# Altium PCB PCB1.pcbdoc
Units mil, origin at the board's own origin, x right, y up, seen from the top; angles counter-clockwise.
Board outline 4500 x 2500 mil, 2 copper layers (Top Layer, Bottom Layer), stack 62.2 mil thick; 64 components, 41 nets, 178 pads, 0 vias.
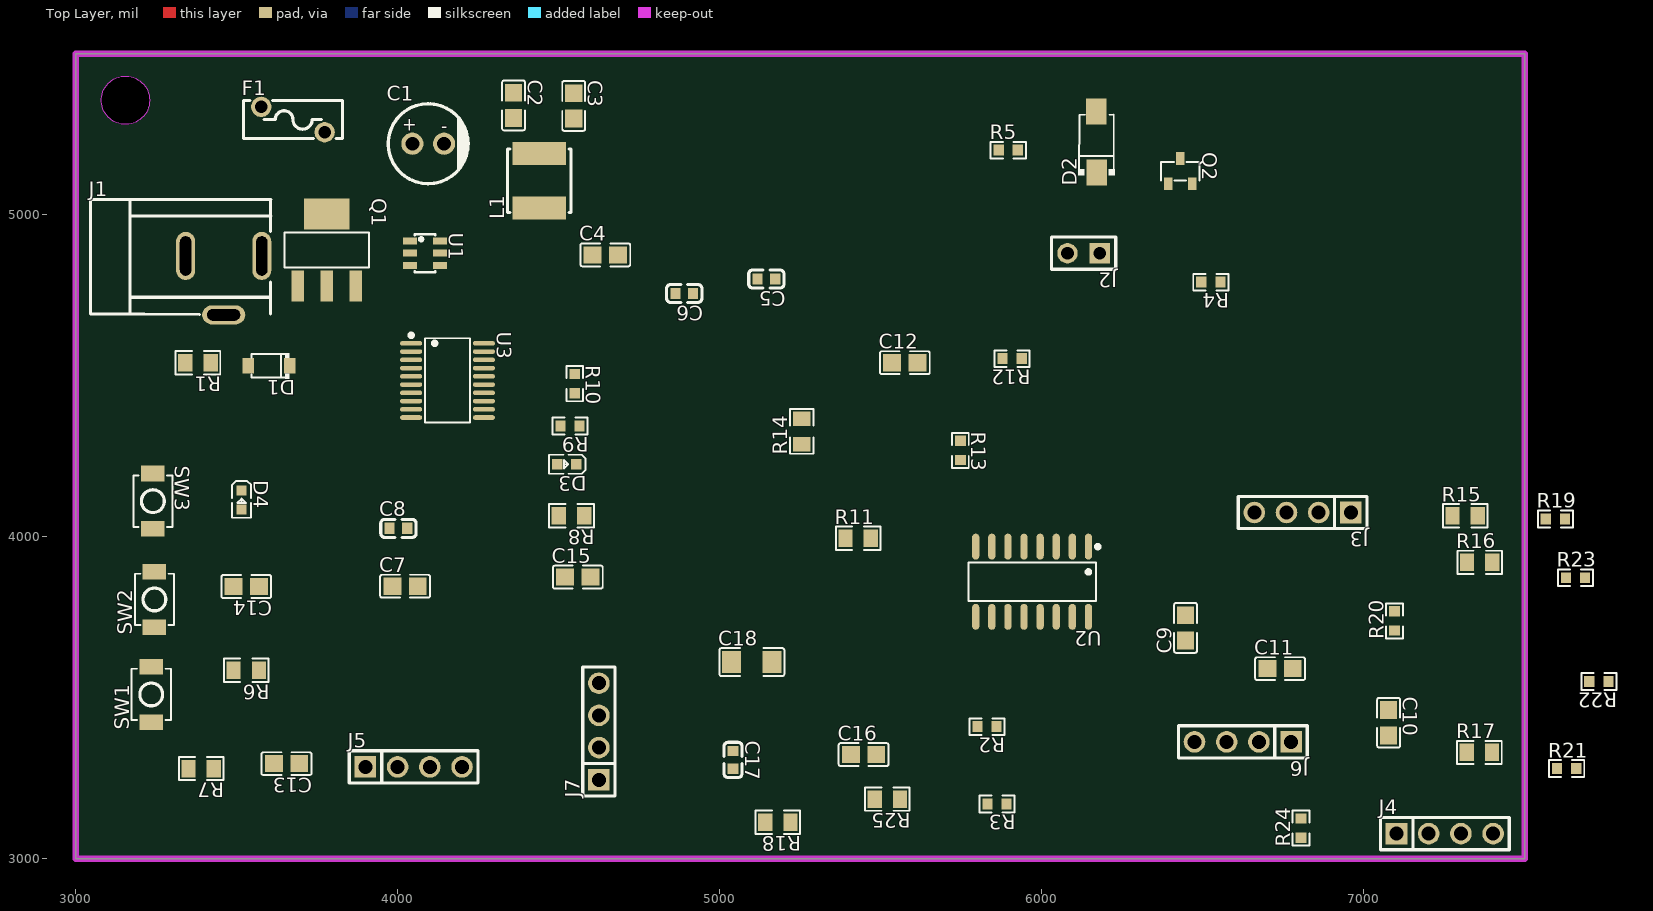
[diagram p0: Top Layer view]
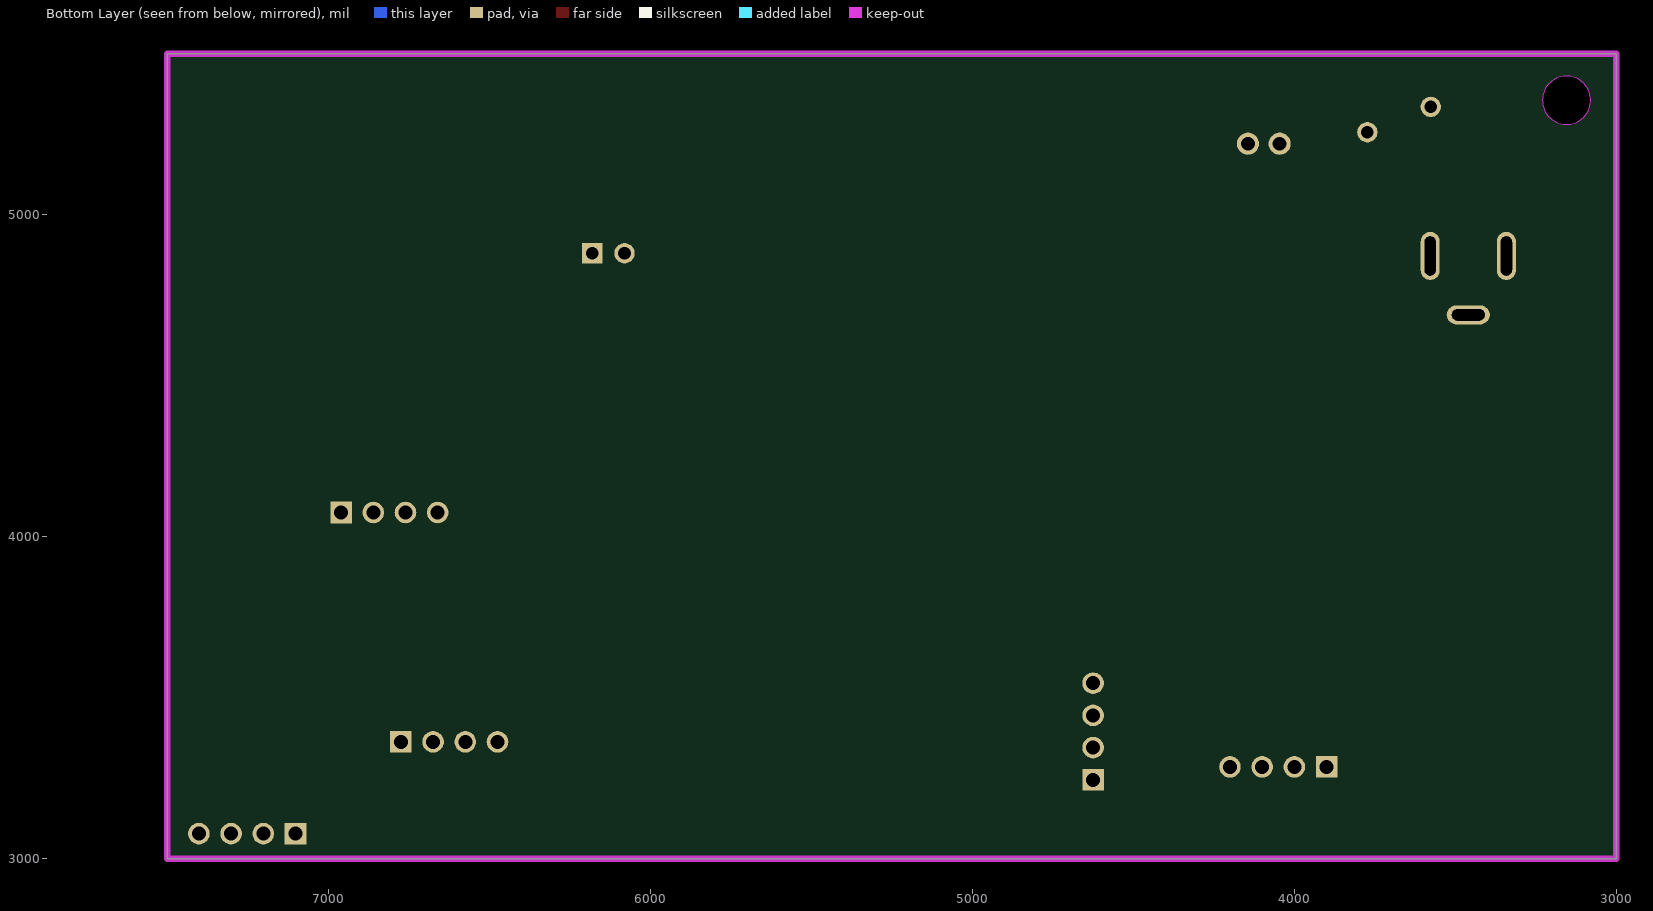
[diagram p1: Bottom Layer view, seen from below]

## Layer stack, top to bottom
Top Solder Mask Layer: solder mask 0.4, Dk 3.3
Top Layer: signal copper 1.4
Dielectric1: surface 59.4, FR4, Dk 4.5
Bottom Layer: signal copper 1.4
Bottom Solder Mask Layer: solder mask 0.4, Dk 3.3

## Board outline
3000,5500 3000,3000 7500,3000 7500,5500
cut-out: 3230,5355 3229.6,5347.3 3228.4,5339.7 3226.4,5332.2 3223.7,5325 3220.3,5318.1 3216.1,5311.5 3211.3,5305.5 3205.9,5300 3200,5295 3193.6,5290.7 3186.8,5287.1 3179.6,5284.2 3172.2,5282 3164.6,5280.6 3156.9,5280 3149.2,5280.2 3141.6,5281.2 3134,5283 3126.7,5285.5 3119.8,5288.8 3113.1,5292.8 3107,5297.4 3101.3,5302.7 3096.2,5308.5 3091.7,5314.7 3087.9,5321.5 3084.8,5328.5 3082.5,5335.9 3080.9,5343.5 3080.1,5351.1 3080.1,5358.9 3080.9,5366.5 3082.5,5374.1 3084.8,5381.5 3087.9,5388.5 3091.7,5395.3 3096.2,5401.5 3101.3,5407.3 3107,5412.6 3113.1,5417.2 3119.8,5421.2 3126.7,5424.5 3134,5427 3141.6,5428.8 3149.2,5429.8 3156.9,5430 3164.6,5429.4 3172.2,5428 3179.6,5425.8 3186.8,5422.9 3193.6,5419.3 3200,5415 3205.9,5410 3211.3,5404.5 3216.1,5398.5 3220.3,5391.9 3223.7,5385 3226.4,5377.8 3228.4,5370.3 3229.6,5362.7

## Design rules (kind name [scope] priority, off if disabled: settings)
BoardOutlineClearance copperThickness1oz [All] p0: genericclearance=10 ignorepadtopadclearanceinfootprint=FALSE except(0: Arc-SplitContinuation Track-SplitContinuation SMDPad-SplitContinuation THPad-SplitContinuation Via-SplitContinuation Fill-SplitContinuation Poly-SplitContinuation Region-SplitContinuation Text-SplitContinuation)
BoardOutlineClearance copperThickness2oz [All] p0: genericclearance=10 ignorepadtopadclearanceinfootprint=FALSE except(0: Arc-SplitContinuation Track-SplitContinuation SMDPad-SplitContinuation THPad-SplitContinuation Via-SplitContinuation Fill-SplitContinuation Poly-SplitContinuation Region-SplitContinuation Text-SplitContinuation)
BoardOutlineClearance Plane_innerPlane [All] p0: genericclearance=10 ignorepadtopadclearanceinfootprint=FALSE except(0: Arc-SplitContinuation Track-SplitContinuation SMDPad-SplitContinuation THPad-SplitContinuation Via-SplitContinuation Fill-SplitContinuation Poly-SplitContinuation Region-SplitContinuation Text-SplitContinuation)
BoardOutlineClearance Copper_copperRegion [All] p0: genericclearance=10 ignorepadtopadclearanceinfootprint=FALSE except(0: Arc-SplitContinuation Track-SplitContinuation SMDPad-SplitContinuation THPad-SplitContinuation Via-SplitContinuation Fill-SplitContinuation Poly-SplitContinuation Region-SplitContinuation Text-SplitContinuation)
BoardOutlineClearance otherClearance [All] p0: genericclearance=10 ignorepadtopadclearanceinfootprint=FALSE except(0: Arc-SplitContinuation Track-SplitContinuation SMDPad-SplitContinuation THPad-SplitContinuation Via-SplitContinuation Fill-SplitContinuation Poly-SplitContinuation Region-SplitContinuation Text-SplitContinuation)
Clearance copperThickness1oz [All] p1: gap=7 ignorepadtopadclearanceinfootprint=FALSE
Clearance copperThickness2oz [All] p1: gap=7 ignorepadtopadclearanceinfootprint=FALSE
Clearance Plane_innerPlane [All] p1: gap=7 ignorepadtopadclearanceinfootprint=FALSE
Clearance Copper_copperRegion [All] p1: gap=7 ignorepadtopadclearanceinfootprint=FALSE
Clearance otherClearance [All] p1: gap=7 ignorepadtopadclearanceinfootprint=FALSE
DiffPairsRouting differentialPair [All] p1: maxuncoupledlength=10 minlimit=5.9843 maxlimit=Infinity mostfreqgap=5.9843 toplayer_minwidth=5 toplayer_prefwidth=10 toplayer_maxwidth=100 bottomlayer_minwidth=5 bottomlayer_prefwidth=10 bottomlayer_maxwidth=100
PasteMaskExpansion pasteMaskExpansion [All] p1: expansion=0
PlaneConnect innerPlane [All] p1: planeconnectstyle=Relief reliefexpansion=20 reliefentries=4 reliefconductorwidth=10 reliefairgap=10
PolygonConnect copperRegion [All] p1: connectstyle=Relief reliefentries=4 reliefconductorwidth=10 polygonreliefangle="90 Angle" airgapwidth=10
RoutingVias viaSize [All] p1: viastyle="Through Hole" holewidth=12.0078 minholewidth=11.811 maxholewidth=248.0314 width=12.0078 minwidth=11.811 maxwidth=248.0314
SolderMaskExpansion solderMaskExpansion [IsVia] p1: useseparateexpansions=TRUE expansion=-1000 expansionbottom=-1000
SolderMaskExpansion solderMaskExpansion [All] p2: useseparateexpansions=TRUE expansion=2.0079 expansionbottom=2.0079
Width copperThickness1oz [All] p1: maxlimit=100 minlimit=5 preferedwidth=10
Width copperThickness2oz [All] p1: maxlimit=100 minlimit=8 preferedwidth=10

## Components (designator, comment, footprint, x,y, rotation, side; value= is the part's Value field where it differs from the comment)
C1 "47uF" CAP-TH_BD6.3-P2.50-D0.6-FD 4095,5220 r0 top
C2 "10uF" C0805#1 4360.2,5338.9 r270 top
C3 "100nF" C0805#1 4546.9,5337.5 r270 top
C4 "100nF" C0805#2 4645,4875 r0 top
C5 "22uF" C0603#1 5145,4800 r180 top
C6 "22uF" C0603#1 4890,4755 r180 top
C7 "100nF" C0805#2 4023.1,3846 r0 top
C8 "4.7uF" C0603#2 4002.5,4025.6 r0 top
C9 "100nF" C0805#2 6446.6,3716.6 r90 top
C10 "100nF" C0805#3 7077.1,3422.3 r270 top
C11 "100nF" C0805#2 6740,3590 r0 top
C12 "100nF" C0805#2 5575,4540 r0 top
C13 "100nF" C0805#2 3655,3295 r180 top
C14 "100nF" C0805#2 3530,3845 r180 top
C15 "100nF" C0805#3 4559.6,3874.5 r0 top
C16 "100nF" C0805#2 5446.9,3323.1 r0 top
C17 "10uF" C0603#2 5041.5,3306.8 r270 top
C18 "220uF" C1206 5099.9,3610.6 r0 top
D1 "BZT52C10" SOD-123_L2.7-W1.6-LS3.7-RD 3600,4530 r180 top
D2 "SS16" SMA_L4.3-W2.6-LS5.0-RD 6170,5225 r90 top
D3 "FC-1608G1-520" LED0603-RD 4525,4225 r180 top
D4 "XL-1608SURC-06" LED0603-RD_RED 3515.3,4113.6 r270 top
F1 "RL60-050" FUSE-TH_L7.8-W3.0-P5.10-D0.5-S2.00 3675,5295 r0 top
J1 "DC005-T25" DC-IN-TH_DC-005-20A-1 3460,4780 r0 top
J2 "LAIL-PZ2.54-2P-L" CONN-TH_LAIL-PZ2.54-2P-L 6130,4880 r180 top
J3 "HX PZ2.54-1x4P ZZ" HDR-TH_4P-P2.54-V-M 6810,4075 r180 top
J4 "HX PZ2.54-1x4P ZZ" HDR-TH_4P-P2.54-V-M 7251.6,3077.8 r0 top
J5 "HX PZ2.54-1x4P ZZ" HDR-TH_4P-P2.54-V-M 4050,3285 r0 top
J6 "HX PZ2.54-1x4P ZZ" HDR-TH_4P-P2.54-V-M 6624.4,3362.8 r180 top
J7 "HX PZ2.54-1x4P ZZ" HDR-TH_4P-P2.54-V-M 4625,3395 r90 top
L1 "3.9uH" IND-SMD_L5.0-W5.0_FNR50XXS 4440,5105 r90 top
Q1 "DMP6023LE-13" SOT-223-4_L6.5-W3.5-P2.30-LS7.0-BR 3780,4890 r270 top
Q2 "AO3400A" SOT-23-3_L2.9-W1.3-P1.90-LS2.4-BR 6430,5135 r270 top
R1 "47kΩ" R0805 3380,4540 r180 top
R2 "1kΩ" R0603#1 5830,3410 r180 top
R3 "1kΩ" R0603#2 5861,3169.9 r180 top
R4 "1kΩ" R0603#1 6525,4790 r180 top
R5 "100kΩ" R0603#2 5896,5200 r0 top
R6 "10kΩ" R0805 3530,3585 r180 top
R7 "10kΩ" R0805 3390,3280 r180 top
R8 "10kΩ" R0805 4540,4065 r180 top
R9 "1kΩ" R0603#2 4535.2,4343.3 r180 top
R10 "1kΩ" R0603#1 4550,4475 r270 top
R11 "10kΩ" R0805 5430,3995 r0 top
R12 "100kΩ" R0603#2 5907.9,4552.5 r180 top
R13 "100kΩ" R0603#1 5747.4,4267.9 r270 top
R14 "10kΩ" R0805 5254.6,4326.7 r90 top
R15 "10kΩ" R0805 7315,4065 r0 top
R16 "10kΩ" R0805 7360,3920 r0 top
R17 "10kΩ" R0805 7358.9,3330 r0 top
R18 "10kΩ" R0805 5180.6,3113.1 r180 top
R19 "1kΩ" R0603#1 7595,4055 r0 top
R20 "1kΩ" R0603#3 7095.6,3738.5 r90 top
R21 "1kΩ" R0603#1 7630,3280 r0 top
R22 "1kΩ" R0603#1 7730,3550 r180 top
R23 "1kΩ" R0603#3 7657.2,3872.4 r0 top
R24 "1kΩ" R0603#1 6805,3095 r90 top
R25 "10kΩ" R0805 5520.6,3185 r180 top
SW1 "TS-1088-AR02016" SW-SMD_L3.9-W3.0-P4.45 3235,3510 r90 top
SW2 "TS-1088-AR02016" SW-SMD_L3.9-W3.0-P4.45 3245,3805 r90 top
SW3 "TS-1088-AR02016" SW-SMD_L3.9-W3.0-P4.45 3240,4110 r270 top
U1 "AP63203WU-7" TSOT-26_L2.9-W1.6-P0.95-LS2.8-BL 4085,4880 r270 top
U2 "74HC4052D,652" SO-16_L9.9-W3.9-P1.27-LS6.0-BL 5970,3860 r180 top
U3 "STM32G030F6P6" TSSOP-20_L6.5-W4.4-P0.65-LS6.4-BL 4155,4485 r270 top

## Footprints (in the part's own frame and the unit in brackets; to place one, negate y for a bottom-side part, rotate by r counter-clockwise, add the part's x,y. Pads: shape width x height; smd on the part's side, far side on the other; paste and mask are expansions set on the pad)
C0603#1 [mil]
  rect 31.5x35.4 smd: 1(-27.6,0) 2(27.6,0)
  silkscreen extent -55,-28 55,28
C0603#2 [mil]
  rect 31.5x35.4 smd: 1(-27.5,0) 2(27.6,0)
  silkscreen extent -55,-28 55,28
C0805#1 [mil]
  rect 55.5x53.1 smd paste-3937 mask+2: 1(-39.4,0) 2(39.3,0)
  silkscreen extent -77,-36 77,36
C0805#2 [mil]
  rect 55.5x53.1 smd paste-3937 mask+2: 1(-39.4,0) 2(39.4,0)
  silkscreen extent -77,-36 77,36
C0805#3 [mil]
  rect 55.5x53.1 smd paste-3937 mask+2: 1(-39.3,0) 2(39.4,0)
  silkscreen extent -77,-36 77,36
C1206 [mil]
  rect 58.5x68 smd paste-3937 mask+2: 1(-62.7,0) 2(62.7,0)
  silkscreen extent -101,-43 101,43
CAP-TH_BD6.3-P2.50-D0.6-FD [mil]
  round 68.9 hole 43.3 paste+0 mask+2: 1(-49.2,0) 2(49.2,0)
  silkscreen extent -124,-124 126,124
CONN-TH_LAIL-PZ2.54-2P-L [mil]
  rect 63x63 hole 39.4 paste+0 mask+2: 1(-50,0)
  round 63 hole 39.4 paste+0 mask+2: 2(50,0)
  silkscreen extent -100,-50 100,50
DC-IN-TH_DC-005-20A-1 [mil]
  oval 59.1x149.6 hole 35.4 slot 122.1 at 90 deg: 1(118.2,91.5) 2(-118.1,91.5)
  oval 133.9x59.1 hole 35.4 slot 102.4 at 0 deg: 3(0,-91.5)
  silkscreen extent -414,-90 146,267
FUSE-TH_L7.8-W3.0-P5.10-D0.5-S2.00 [mil]
  round 63 hole 39.4: 1(-98.4,39.4) 2(98.4,-39.4)
  silkscreen extent -154,-59 154,59
HDR-TH_4P-P2.54-V-M [mil]
  rect 66.9x66.9 hole 43.3: 1(-150,0)
  round 66.9 hole 43.3: 2(-50,0) 3(50,0) 4(150,0)
  silkscreen extent -200,-50 200,50
IND-SMD_L5.0-W5.0_FNR50XXS [mil]
  rect 70.9x165.4 smd: 1(-84.6,0) 2(84.6,0)
  silkscreen extent -98,-98 98,98
LED0603-RD [mil]
  rect 31.5x31.5 smd: 1(-29.5,0) 2(29.5,0)
  silkscreen extent -59,-29 55,30
LED0603-RD_RED [mil]
  rect 31.5x31.5 smd: 1(-29.5,-0.1) 2(29.5,0.2)
  silkscreen extent -59,-29 55,30
R0603#1 [mil]
  rect 31.8x34 smd paste-3937 mask+2: 1(-29.7,0) 2(29.7,0)
  silkscreen extent -54,-26 54,26
R0603#2 [mil]
  rect 31.8x34 smd paste-3937 mask+2: 1(-29.7,0) 2(29.6,0)
  silkscreen extent -55,-26 54,26
R0603#3 [mil]
  rect 31.8x34 smd paste-3937 mask+2: 1(-29.6,0) 2(29.7,0)
  silkscreen extent -54,-26 54,26
R0805 [mil]
  rect 44.6x54.2 smd paste-3937 mask+2: 1(-39.4,0) 2(39.4,0)
  silkscreen extent -69,-36 69,36
SMA_L4.3-W2.6-LS5.0-RD [mil]
  rect 80.6x63.8 smd: 1(-94.6,-0.4) 2(94.6,0.4)
  silkscreen extent -103,-57 85,57
SO-16_L9.9-W3.9-P1.27-LS6.0-BL [mil]
  oval 22.6x80.2 smd: 1(-175,-109) 2(-125,-109) 3(-75,-109) 4(-25,-109) 5(25,-109) 6(75,-109) 7(125,-109) 8(175,-109) 9(175,109) 10(125,109) 11(75,109) 12(25,109) 13(-25,109) 14(-75,109) 15(-125,109) 16(-175,109)
  silkscreen extent -210,-115 198,60
SOD-123_L2.7-W1.6-LS3.7-RD [mil]
  rect 35.8x48 smd: 1(-64.4,0) 2(64.4,0)
  silkscreen extent -63,-40 54,39
SOT-23-3_L2.9-W1.3-P1.90-LS2.4-BR [mil]
  rect 39.4x25.6 smd: 1(39.4,-37.4) 2(39.4,37.4) 3(-39.4,0)
  silkscreen extent -29,-60 29,60
SOT-223-4_L6.5-W3.5-P2.30-LS7.0-BR [mil]
  rect 97.2x38.6 smd: 1(111.6,-90.6) 2(111.6,0) 3(111.6,90.6)
  rect 97.2x141.7 smd: 4(-111.6,0)
  silkscreen extent -54,-131 54,131
SW-SMD_L3.9-W3.0-P4.45 [mil]
  rect 48.4x73.2 smd: 1(-86,0) 2(86,0)
  silkscreen extent -80,-61 80,61
TSOT-26_L2.9-W1.6-P0.95-LS2.8-BL [mil]
  rect 21.7x43.3 smd paste+0 mask+2: 1(-37.4,-47.2) 2(0,-47.2) 3(37.4,-47.2) 4(37.4,47.2) 5(0,47.2) 6(-37.4,47.2)
  silkscreen extent -59,-32 59,32
TSSOP-20_L6.5-W4.4-P0.65-LS6.4-BL [mil]
  oval 14.3x68.6 smd: 1(-115.2,-113) 2(-89.6,-113) 3(-64,-113) 4(-38.4,-113) 5(-12.8,-113) 6(12.8,-113) 7(38.4,-113) 8(64,-113) 9(89.6,-113) 10(115.2,-113) 11(115.2,113) 12(89.6,113) 13(64,113) 14(38.4,113) 15(12.8,113) 16(-12.8,113) 17(-38.4,113) 18(-64,113) 19(-89.6,113) 20(-115.2,113)
  silkscreen extent -146,-119 131,70

## Nets (pads, with @x,y where several pads share a name; then routed paths per layer and width w, separated by ;. In a path a pad name is that pad's centre, name@x,y a point inside that pad or via, vN(x,y) a via of type N, cw(c..) or ccw(c..) an arc to the next point about the centre after c; other vN are vias at no path point)
$1N171: F1.1 J1.1
$1N175: F1.2 Q1.2 Q1.4
$1N192: D1.2 Q1.1 R1.1
$1N448: C4.1 U1.6
$1N450: C4.2 L1.1 U1.5
$1N997: Q2.1 R4.2 R5.1
$1N1011: D2.2 J2.2 Q2.3
$1N1973: J7.3 R2.2 R25.2
$1N1982: J7.4 R3.2
$1N2020: D3.2 R9.2
$1N2028: D4.2 R10.2
$1N3740: J3.3 R15.2 R19.2
$1N3749: J3.4 R20.2
$1N3768: J4.3 R16.2 R21.2
$1N3777: J4.4 R22.2
$1N3796: J6.3 R17.2 R23.2
$1N3805: J6.4 R24.2
+3V3: C5.1 C6.1 C7.1 C8.1 C9.1 C10.1 C11.1 C12.1 C16.1 C17.1 C18.1 J3.1 J4.1 J5.1 J6.1 J7.1 L1.2 R6.1 R7.1 R8.1 R11.1 R14.1 R15.1 R16.1 R17.1 R18.1 R25.1 U1.1 U2.16 U3.4
AUX_RX_MUX: R21.1 U2.14
AUX_TX_MUX: R22.1 U2.5
GND: C1.2 C2.2 C3.2 C5.2 C6.2 C7.2 C8.2 C9.2 C10.2 C11.2 C12.2 C13.2 C14.2 C15.2 C16.2 C17.2 C18.2 D3.1 D4.1 J1.2 J3.2 J4.2 J5.3 J6.2 J7.2 Q2.2 R1.2 R5.2 R12.2 R13.2 SW1.2 SW2.2 SW3.2 U1.4 U2.7 U2.8 U3.5
KEY_AUTO: C13.1 R6.2 SW1.1 U3.16
KEY_MANUAL: C14.1 R7.2 SW2.1 U3.12
LED_FAULT: R10.1 U3.14
LED_STATUS: R9.1 U3.13
MAIN_RX_MUX: R19.1 U2.12
MAIN_TX_MUX: R20.1 U2.1
MUX_E: R11.2 U2.6 U3.7
MUX_S0: R12.1 U2.10 U3.2
MUX_S1: R13.1 U2.9 U3.3
NRST: C15.1 R8.2 SW3.1 U3.6
PUMP_CMD: R4.1 U3.11
RES_RX_MUX: R23.1 U2.15
RES_TX_MUX: R24.1 U2.2
SENS_RX: R14.2 U2.3 U3.10
SENS_TX: U2.13 U3.9
SWCLK: J5.4 U3.19
SWDIO: J5.2 U3.18
VIN_P: C1.1 C2.1 C3.1 D1.1 D2.1 J2.1 Q1.3 U1.2 U1.3
WIFI_RX: R3.1 R18.2 U3.1
WIFI_TX: R2.1 U3.20
pads on no net: J1.3 U2.4 U2.11 U3.8 U3.15 U3.17

## Keep-outs
Board Outline Layer:
  region: 3230,5355 3229.6,5347.3 3228.4,5339.7 3226.4,5332.2 3223.7,5325 3220.3,5318.1 3216.1,5311.5 3211.3,5305.5 3205.9,5300 3200,5295 3193.6,5290.7 3186.8,5287.1 3179.6,5284.2 3172.2,5282 3164.6,5280.6 3156.9,5280 3149.2,5280.2 3141.6,5281.2 3134,5283 3126.7,5285.5 3119.8,5288.8 3113.1,5292.8 3107,5297.4 3101.3,5302.7 3096.2,5308.5 3091.7,5314.7 3087.9,5321.5 3084.8,5328.5 3082.5,5335.9 3080.9,5343.5 3080.1,5351.1 3080.1,5358.9 3080.9,5366.5 3082.5,5374.1 3084.8,5381.5 3087.9,5388.5 3091.7,5395.3 3096.2,5401.5 3101.3,5407.3 3107,5412.6 3113.1,5417.2 3119.8,5421.2 3126.7,5424.5 3134,5427 3141.6,5428.8 3149.2,5429.8 3156.9,5430 3164.6,5429.4 3172.2,5428 3179.6,5425.8 3186.8,5422.9 3193.6,5419.3 3200,5415 3205.9,5410 3211.3,5404.5 3216.1,5398.5 3220.3,5391.9 3223.7,5385 3226.4,5377.8 3228.4,5370.3 3229.6,5362.7
  region: 3230,5355 3229.6,5347.3 3228.4,5339.7 3226.4,5332.2 3223.7,5325 3220.3,5318.1 3216.1,5311.5 3211.3,5305.5 3205.9,5300 3200,5295 3193.6,5290.7 3186.8,5287.1 3179.6,5284.2 3172.2,5282 3164.6,5280.6 3156.9,5280 3149.2,5280.2 3141.6,5281.2 3134,5283 3126.7,5285.5 3119.8,5288.8 3113.1,5292.8 3107,5297.4 3101.3,5302.7 3096.2,5308.5 3091.7,5314.7 3087.9,5321.5 3084.8,5328.5 3082.5,5335.9 3080.9,5343.5 3080.1,5351.1 3080.1,5358.9 3080.9,5366.5 3082.5,5374.1 3084.8,5381.5 3087.9,5388.5 3091.7,5395.3 3096.2,5401.5 3101.3,5407.3 3107,5412.6 3113.1,5417.2 3119.8,5421.2 3126.7,5424.5 3134,5427 3141.6,5428.8 3149.2,5429.8 3156.9,5430 3164.6,5429.4 3172.2,5428 3179.6,5425.8 3186.8,5422.9 3193.6,5419.3 3200,5415 3205.9,5410 3211.3,5404.5 3216.1,5398.5 3220.3,5391.9 3223.7,5385 3226.4,5377.8 3228.4,5370.3 3229.6,5362.7
  lines w0.1: 3080.1,5351.1 3080.9,5343.5 3082.5,5335.9 3084.8,5328.5 3087.9,5321.5 3091.7,5314.7 3096.2,5308.5 3101.3,5302.7 3107,5297.4 3113.1,5292.8 3119.8,5288.8 3126.7,5285.5 3134,5283 3141.6,5281.2 3149.2,5280.2 3156.9,5280 3164.6,5280.6 3172.2,5282 3179.6,5284.2 3186.8,5287.1 3193.6,5290.7 3200,5295 3205.9,5300 3211.3,5305.5 3216.1,5311.5 3220.3,5318.1 3223.7,5325 3226.4,5332.2 3228.4,5339.7 3229.6,5347.3 3230,5355 3229.6,5362.7 3228.4,5370.3 3226.4,5377.8 3223.7,5385 3220.3,5391.9 3216.1,5398.5 3211.3,5404.5 3205.9,5410 3200,5415 3193.6,5419.3 3186.8,5422.9 3179.6,5425.8 3172.2,5428 3164.6,5429.4 3156.9,5430 3149.2,5429.8 3141.6,5428.8 3134,5427 3126.7,5424.5 3119.8,5421.2 3113.1,5417.2 3107,5412.6 3101.3,5407.3 3096.2,5401.5 3091.7,5395.3 3087.9,5388.5 3084.8,5381.5 3082.5,5374.1 3080.9,5366.5 3080.1,5358.9 3080.1,5351.1
  lines w20: 3000,3000 3000,5500 7500,5500 7500,3000 3000,3000

## Silkscreen, mask and mechanical layers (free items; w line width, h text height)
Mechanical Layer:
  lines w0.1: 3080.1,5351.1 3080.9,5343.5 3082.5,5335.9 3084.8,5328.5 3087.9,5321.5 3091.7,5314.7 3096.2,5308.5 3101.3,5302.7 3107,5297.4 3113.1,5292.8 3119.8,5288.8 3126.7,5285.5 3134,5283 3141.6,5281.2 3149.2,5280.2 3156.9,5280 3164.6,5280.6 3172.2,5282 3179.6,5284.2 3186.8,5287.1 3193.6,5290.7 3200,5295 3205.9,5300 3211.3,5305.5 3216.1,5311.5 3220.3,5318.1 3223.7,5325 3226.4,5332.2 3228.4,5339.7 3229.6,5347.3 3230,5355 3229.6,5362.7 3228.4,5370.3 3226.4,5377.8 3223.7,5385 3220.3,5391.9 3216.1,5398.5 3211.3,5404.5 3205.9,5410 3200,5415 3193.6,5419.3 3186.8,5422.9 3179.6,5425.8 3172.2,5428 3164.6,5429.4 3156.9,5430 3149.2,5429.8 3141.6,5428.8 3134,5427 3126.7,5424.5 3119.8,5421.2 3113.1,5417.2 3107,5412.6 3101.3,5407.3 3096.2,5401.5 3091.7,5395.3 3087.9,5388.5 3084.8,5381.5 3082.5,5374.1 3080.9,5366.5 3080.1,5358.9 3080.1,5351.1

## Text inside footprints (layer, text, board x,y; h text height)
C1: Top Silkscreen Layer "+" at 4015,5260 h39.4; Top Silkscreen Layer "-" at 4135,5255 h39.4